# Altium PCB 核心板.PcbDoc
Units mm, origin at the board's own origin, x right, y up, seen from the top; angles counter-clockwise.
Board outline 24 x 19.5 mm, 3 copper layers (Top Layer, Mid-Layer 16, Bottom Layer), stack 1.031 mm thick; 2 components, 0 nets, 12 pads, 0 vias.
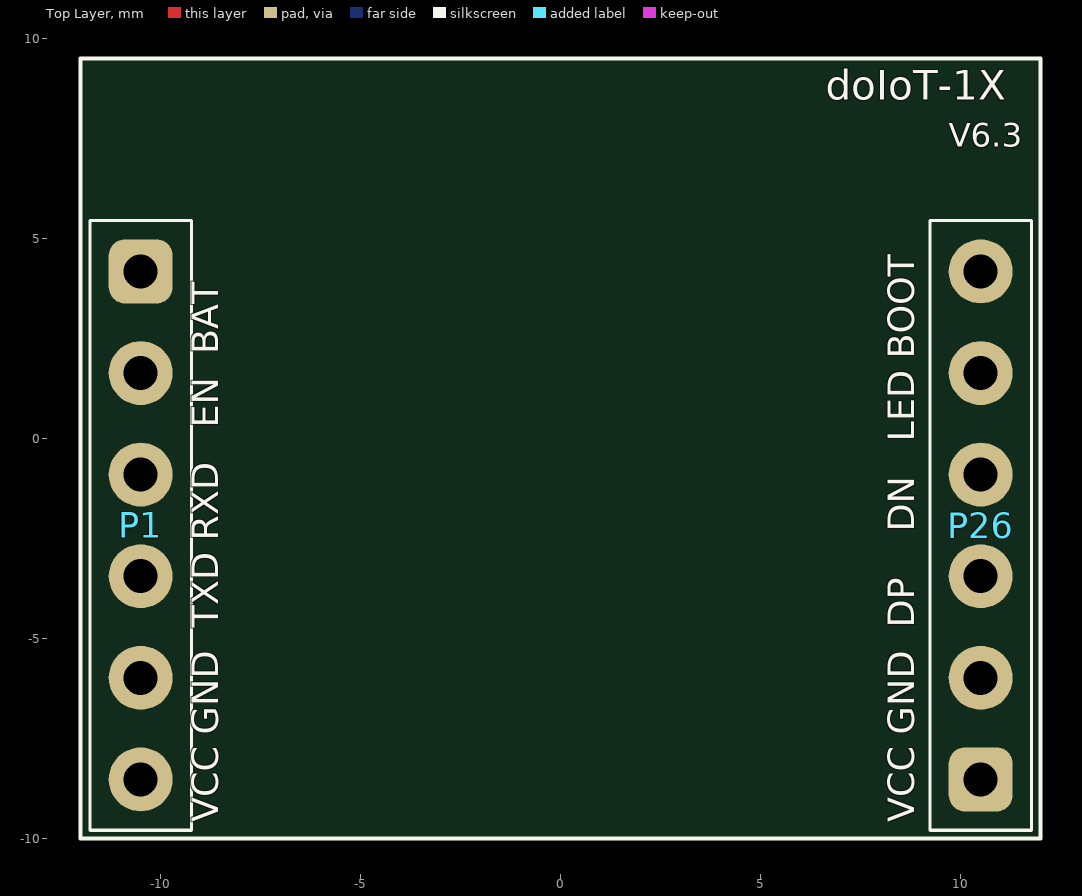
[diagram p0: Top Layer view]
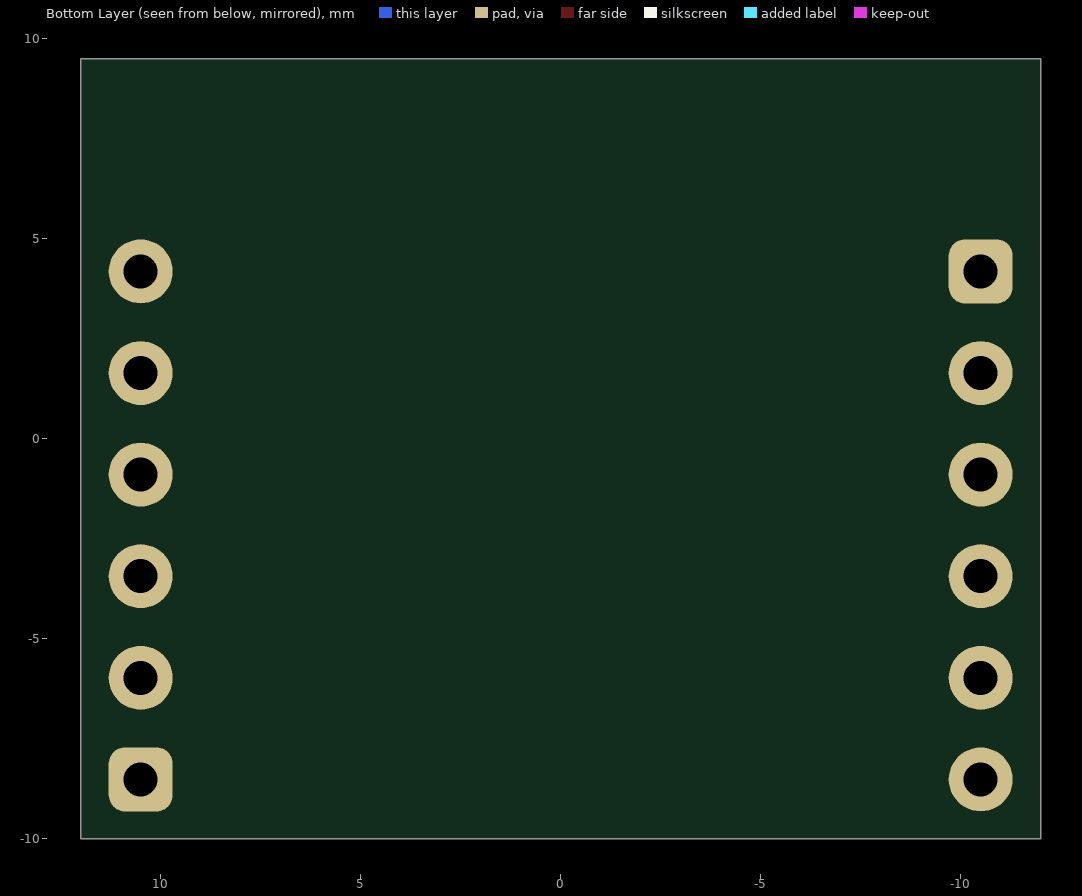
[diagram p1: Bottom Layer view, seen from below]

## Layer stack, top to bottom
Top Solder: solder mask 0.0102, Solder Resist, Dk 3.5
Top Layer: signal copper 0.0356
Dielectric1: prepreg 0.32, Composite dielectric, Dk 4.1
Dielectric 1: prepreg 0.0711, Composite dielectric, Dk 4.1
Dielectric 3: prepreg 0.0711, Composite dielectric, Dk 4.1
Mid-Layer 16: signal copper 0.0356
Dielectric 4: prepreg 0.0711, Composite dielectric, Dk 4.8
Dielectric 2: prepreg 0.0711, Composite dielectric, Dk 4.8
Dielectric2: prepreg 0.32, Composite dielectric, Dk 4.8
Bottom Layer: signal copper 0.0356
Bottom Solder: solder mask 0.0102, Solder Resist, Dk 3.5

## Board outline
-12,-10 -12,9.5 12,9.5 12,-10

## Design rules (kind name [scope] priority, off if disabled: settings)
Clearance [All] p1: gap=0.178 ignorepadtopadclearanceinfootprint=FALSE
ComponentClearance [All] p1: gap=0.203 collisioncheckmode=3 verticalgap=0.203 showdistances=FALSE
FabricationTestPointUsage TestPointUsage [All] p1: valid=0 allowmultiple=FALSE
FabricationTestpoint Testpoint [All] p1: side=3 testpointundercomponent=TRUE minsize=1.016 maxsize=2.54 preferedsize=1.524 minholesize=0 maxholesize=1.016 preferedholesize=0.813 testpointgrid=0.025 allowsidetop=TRUE allowsidebottom=TRUE usegrid=TRUE gridtolerance=0
PlaneConnect [All] p1: planeconnectstyle=Direct reliefexpansion=0.508 reliefentries=4 reliefconductorwidth=0.254 reliefairgap=0.254
PolygonConnect [All] p1: connectstyle=Direct reliefconductorwidth=0.254 reliefentries=4 polygonreliefangle="90 Angle" airgapwidth=0.254
RoutingLayers [All] p1: top layer_v5=TRUE mid layer 16_v5=FALSE bottom layer_v5=TRUE
RoutingVias [All] p1: holewidth=0.32 width=0.64 viastyle="Through Hole" minholewidth=0.32 minwidth=0.64 maxholewidth=0.5 maxwidth=1
SilkToSolderMaskClearance SilkscreenOverComponentPads [IsPad] p1: minsilkscreentomaskgap=0.254 clearancetoexposedcopper=TRUE
SolderMaskExpansion [All] p1: expansion=0.102 istentingtop=FALSE
Width [All] p1: maxlimit=2.54 minlimit=0.178 preferedwidth=0.254
24 further rules are at their usual default settings.

## Components (designator, comment, footprint, x,y, rotation, side; value= is the part's Value field where it differs from the comment)
P1 "SIP6" SIP6 -10.5,-2.168 r270 top
P26 "SIP6" SIP6 10.5,-2.168 r90 top

## Footprints (in the part's own frame and the unit in brackets; to place one, negate y for a bottom-side part, rotate by r counter-clockwise, add the part's x,y. Pads: shape width x height; smd on the part's side, far side on the other; paste and mask are expansions set on the pad)
SIP6 [mil]
  rrect50% 63x63 hole 33.5: 1(-250,0)
  round 63 hole 33.5: 2(-150,0) 3(-50,0) 4(50,0) 5(150,0) 6(250,0)
  silkscreen extent -300,-50 300,50

## Part data
P1 P26: "不焊接"

## Nets (pads, with @x,y where several pads share a name; then routed paths per layer and width w, separated by ;. In a path a pad name is that pad's centre, name@x,y a point inside that pad or via, vN(x,y) a via of type N, cw(c..) or ccw(c..) an arc to the next point about the centre after c; other vN are vias at no path point)
pads on no net: P1.1 P1.2 P1.3 P1.4 P1.5 P1.6 P26.1 P26.2 P26.3 P26.4 P26.5 P26.6

## Silkscreen, mask and mechanical layers (free items; w line width, h text height)
Top Overlay:
  the board outline again, w0.1
  text "doIoT-1X" at 6.63,8.218 h1.27
  text "V6.3" at 9.705,7.093 h1.02
  text "VCC GND  TXD RXD   EN  BAT" at -8.332,-9.589 h1.14 r90
  text "VCC GND  DP    DN   LED BOOT" at 9.067,-9.589 h1.14 r90
Mechanical 16:
  drawing of 1818 lines, arcs and shapes, not listed
  text "1" at -173.828,136.262 h1.78
  text "2" at -124.789,136.262 h1.78
  text "3" at -75.53,136.262 h1.78
  text "4" at -26.237,136.262 h1.78
  text "5" at 23.039,136.262 h1.78
  text "6" at 72.061,136.262 h1.78
  text "7" at 121.591,136.262 h1.78
  text "8" at 170.613,136.262 h1.78
  text "A" at -195.96,102.277 h1.78
  text "A" at 192.66,102.277 h1.78
  text "B" at -195.96,31.665 h1.78
  text "B" at 192.66,31.665 h1.78
  text "C" at -195.96,-38.947 h1.78
  text "C" at 192.66,-38.947 h1.78
  text "D" at -195.96,-109.051 h1.78
  text "D" at 192.66,-109.051 h1.78
  text "Title:" at 98.553,-127.771 h1.78
  text "doIoT-1X" at 106.173,-127.771 h1.78
  text "成都度云未来科技有限公司" at 135.129,-128.787 h2.54
  text "Chengdu  Doiot  Technology  Co.,LTD" at 135.51,-130.565 h1.7
  text "Size:" at 98.807,-132.089 h1.27
  text "24x24mm" at 103.887,-132.089 h1.27
  text "Revision:" at 116.841,-132.089 h1.27
  text "V6.3" at 125.985,-132.089 h1.27
  text "www.doiot.cn" at 139.842,-134.813 h2.03
  text "By:" at 116.841,-136.153 h1.27
  text "Aaron ZYF" at 121.159,-136.153 h1.27
  text "Size:" at 98.807,-136.407 h1.27
  text ".PRINT_DATE" at 103.633,-136.407 h1.27
  text "1" at -173.828,-140.598 h1.78
  text "2" at -124.789,-140.598 h1.78
  text "3" at -75.53,-140.598 h1.78
  text "4" at -26.237,-140.598 h1.78
  text "5" at 23.039,-140.598 h1.78
  text "6" at 72.061,-140.598 h1.78
  text "7" at 121.591,-140.598 h1.78
  text "8" at 170.613,-140.598 h1.78